# Altium PCB BOARD_4LAYER.PcbDoc (part 4 of 21)
Units mil, origin at the board's own origin, x right, y up, seen from the top; angles counter-clockwise.
Board outline 6692.91 x 10039.37 mil, 4 copper layers (Top Layer, Mid Layer 1, Mid Layer 2, Bottom Layer), stack 66.299 mil thick; 1532 components, 908 nets, 4105 pads, 1286 vias.
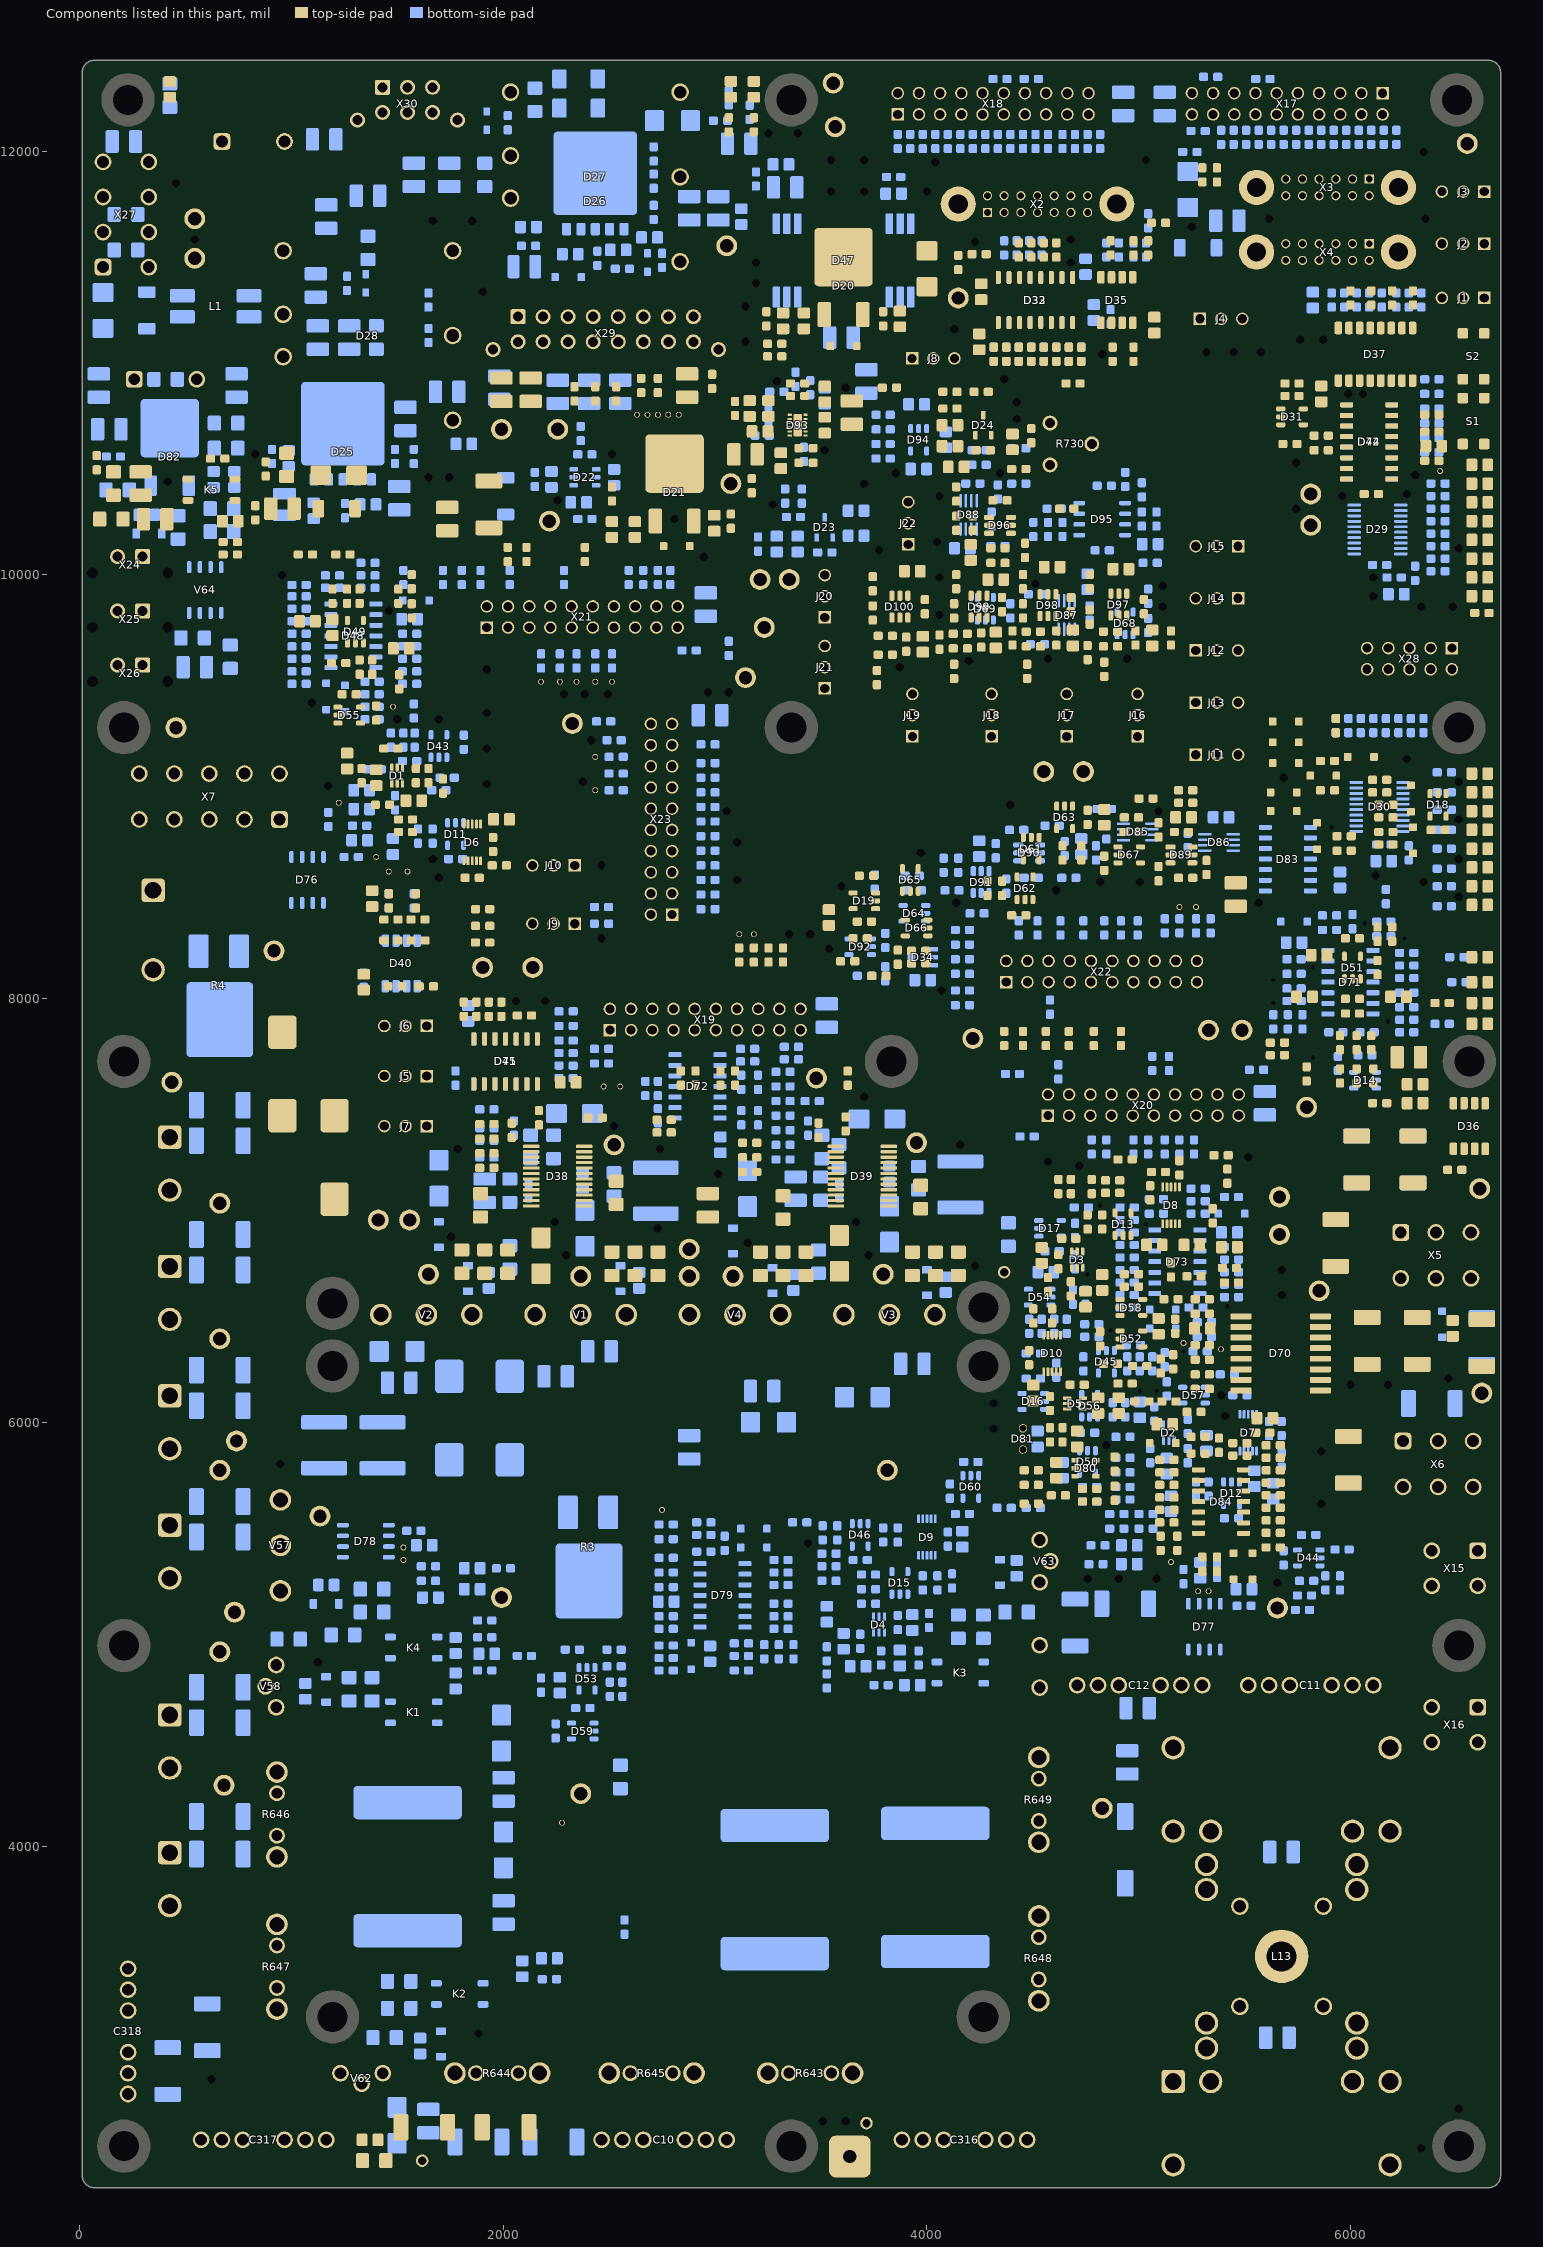
[diagram p6: the components of this part, seen from the top]

## Design rules (kind name [scope] priority, off if disabled: settings) (continued)
PolygonConnect PolygonConnect_In_UL_L-01_P380 [IsNamedPolygon('UL_L-01_P380')] p291: thpad.connectstyle=Relief thpad.reliefconductorwidth=19.68 thpad.reliefentries=4 thpad.polygonreliefangle="90 Angle" thpad.airgapwidth=9.84 smdpad.connectstyle=Relief smdpad.reliefconductorwidth=19.68 smdpad.reliefentries=4 smdpad.polygonreliefangle="90 Angle" smdpad.airgapwidth=9.84 via.connectstyle=Direct via.reliefconductorwidth=5.12 via.reliefentries=2 via.polygonreliefangle="90 Angle" via.airgapwidth=0
PolygonConnect PolygonConnect_In_$6N94_L01_P037 [IsNamedPolygon('$6N94_L01_P037')] p292: thpad.connectstyle=Relief thpad.reliefconductorwidth=19.68 thpad.reliefentries=4 thpad.polygonreliefangle="90 Angle" thpad.airgapwidth=9.84 smdpad.connectstyle=Relief smdpad.reliefconductorwidth=19.68 smdpad.reliefentries=4 smdpad.polygonreliefangle="90 Angle" smdpad.airgapwidth=9.84 via.connectstyle=Direct via.reliefconductorwidth=5.12 via.reliefentries=2 via.polygonreliefangle="90 Angle" via.airgapwidth=0
PolygonConnect PolygonConnect_In_$4N2807_L-01_P580 [IsNamedPolygon('$4N2807_L-01_P580')] p293: thpad.connectstyle=Relief thpad.reliefconductorwidth=19.68 thpad.reliefentries=4 thpad.polygonreliefangle="90 Angle" thpad.airgapwidth=9.84 smdpad.connectstyle=Relief smdpad.reliefconductorwidth=19.68 smdpad.reliefentries=4 smdpad.polygonreliefangle="90 Angle" smdpad.airgapwidth=9.84 via.connectstyle=Direct via.reliefconductorwidth=5.12 via.reliefentries=2 via.polygonreliefangle="90 Angle" via.airgapwidth=0
PolygonConnect PolygonConnect_In_GND_L02_P393 [IsNamedPolygon('GND_L02_P393')] p294: thpad.connectstyle=Relief thpad.reliefconductorwidth=19.68 thpad.reliefentries=4 thpad.polygonreliefangle="90 Angle" thpad.airgapwidth=9.84 smdpad.connectstyle=Relief smdpad.reliefconductorwidth=19.68 smdpad.reliefentries=4 smdpad.polygonreliefangle="90 Angle" smdpad.airgapwidth=9.84 via.connectstyle=Direct via.reliefconductorwidth=5.12 via.reliefentries=2 via.polygonreliefangle="90 Angle" via.airgapwidth=0
PolygonConnect PolygonConnect_In_$4N2819_L-01_P590 [IsNamedPolygon('$4N2819_L-01_P590')] p295: thpad.connectstyle=Relief thpad.reliefconductorwidth=19.68 thpad.reliefentries=4 thpad.polygonreliefangle="90 Angle" thpad.airgapwidth=9.84 smdpad.connectstyle=Relief smdpad.reliefconductorwidth=19.68 smdpad.reliefentries=4 smdpad.polygonreliefangle="90 Angle" smdpad.airgapwidth=9.84 via.connectstyle=Direct via.reliefconductorwidth=5.12 via.reliefentries=2 via.polygonreliefangle="90 Angle" via.airgapwidth=0
PolygonConnect PolygonConnect_In_$4N2806_L-01_P572 [IsNamedPolygon('$4N2806_L-01_P572')] p296: thpad.connectstyle=Relief thpad.reliefconductorwidth=19.68 thpad.reliefentries=4 thpad.polygonreliefangle="90 Angle" thpad.airgapwidth=9.84 smdpad.connectstyle=Relief smdpad.reliefconductorwidth=19.68 smdpad.reliefentries=4 smdpad.polygonreliefangle="90 Angle" smdpad.airgapwidth=9.84 via.connectstyle=Direct via.reliefconductorwidth=5.12 via.reliefentries=2 via.polygonreliefangle="90 Angle" via.airgapwidth=0
PolygonConnect PolygonConnect_In_PGND_L-01_P209 [IsNamedPolygon('PGND_L-01_P209')] p297: thpad.connectstyle=Relief thpad.reliefconductorwidth=19.68 thpad.reliefentries=4 thpad.polygonreliefangle="90 Angle" thpad.airgapwidth=9.84 smdpad.connectstyle=Relief smdpad.reliefconductorwidth=19.68 smdpad.reliefentries=4 smdpad.polygonreliefangle="90 Angle" smdpad.airgapwidth=9.84 via.connectstyle=Direct via.reliefconductorwidth=5.12 via.reliefentries=2 via.polygonreliefangle="90 Angle" via.airgapwidth=0
PolygonConnect PolygonConnect_In_+U_AMP_L01_P045 [IsNamedPolygon('+U_AMP_L01_P045')] p298: thpad.connectstyle=Relief thpad.reliefconductorwidth=19.68 thpad.reliefentries=4 thpad.polygonreliefangle="90 Angle" thpad.airgapwidth=9.84 smdpad.connectstyle=Relief smdpad.reliefconductorwidth=19.68 smdpad.reliefentries=4 smdpad.polygonreliefangle="90 Angle" smdpad.airgapwidth=9.84 via.connectstyle=Direct via.reliefconductorwidth=5.12 via.reliefentries=2 via.polygonreliefangle="90 Angle" via.airgapwidth=0
PolygonConnect PolygonConnect_In_$4N4008_L01_P551 [IsNamedPolygon('$4N4008_L01_P551')] p299: thpad.connectstyle=Relief thpad.reliefconductorwidth=19.68 thpad.reliefentries=4 thpad.polygonreliefangle="90 Angle" thpad.airgapwidth=9.84 smdpad.connectstyle=Relief smdpad.reliefconductorwidth=19.68 smdpad.reliefentries=4 smdpad.polygonreliefangle="90 Angle" smdpad.airgapwidth=9.84 via.connectstyle=Direct via.reliefconductorwidth=5.12 via.reliefentries=2 via.polygonreliefangle="90 Angle" via.airgapwidth=0
PolygonConnect PolygonConnect_In_GND_L-01_P390 [IsNamedPolygon('GND_L-01_P390')] p300: thpad.connectstyle=Relief thpad.reliefconductorwidth=19.68 thpad.reliefentries=4 thpad.polygonreliefangle="90 Angle" thpad.airgapwidth=9.84 smdpad.connectstyle=Relief smdpad.reliefconductorwidth=19.68 smdpad.reliefentries=4 smdpad.polygonreliefangle="90 Angle" smdpad.airgapwidth=9.84 via.connectstyle=Direct via.reliefconductorwidth=5.12 via.reliefentries=2 via.polygonreliefangle="90 Angle" via.airgapwidth=0
PolygonConnect PolygonConnect_In_$6N3156_L02_P078 [IsNamedPolygon('$6N3156_L02_P078')] p301: thpad.connectstyle=Relief thpad.reliefconductorwidth=19.68 thpad.reliefentries=4 thpad.polygonreliefangle="90 Angle" thpad.airgapwidth=9.84 smdpad.connectstyle=Relief smdpad.reliefconductorwidth=19.68 smdpad.reliefentries=4 smdpad.polygonreliefangle="90 Angle" smdpad.airgapwidth=9.84 via.connectstyle=Direct via.reliefconductorwidth=5.12 via.reliefentries=2 via.polygonreliefangle="90 Angle" via.airgapwidth=0
PolygonConnect PolygonConnect_In_-U_VENT_L01_P534 [IsNamedPolygon('-U_VENT_L01_P534')] p302: thpad.connectstyle=Relief thpad.reliefconductorwidth=19.68 thpad.reliefentries=4 thpad.polygonreliefangle="90 Angle" thpad.airgapwidth=9.84 smdpad.connectstyle=Relief smdpad.reliefconductorwidth=19.68 smdpad.reliefentries=4 smdpad.polygonreliefangle="90 Angle" smdpad.airgapwidth=9.84 via.connectstyle=Direct via.reliefconductorwidth=5.12 via.reliefentries=2 via.polygonreliefangle="90 Angle" via.airgapwidth=0
PolygonConnect PolygonConnect_In_~U_FIN_L-01_P131 [IsNamedPolygon('~U_FIN_L-01_P131')] p303: thpad.connectstyle=Relief thpad.reliefconductorwidth=19.68 thpad.reliefentries=4 thpad.polygonreliefangle="90 Angle" thpad.airgapwidth=9.84 smdpad.connectstyle=Relief smdpad.reliefconductorwidth=19.68 smdpad.reliefentries=4 smdpad.polygonreliefangle="90 Angle" smdpad.airgapwidth=9.84 via.connectstyle=Direct via.reliefconductorwidth=5.12 via.reliefentries=2 via.polygonreliefangle="90 Angle" via.airgapwidth=0
PolygonConnect PolygonConnect_In_+U_UM_L02_P488 [IsNamedPolygon('+U_UM_L02_P488')] p304: thpad.connectstyle=Relief thpad.reliefconductorwidth=19.68 thpad.reliefentries=4 thpad.polygonreliefangle="90 Angle" thpad.airgapwidth=9.84 smdpad.connectstyle=Relief smdpad.reliefconductorwidth=19.68 smdpad.reliefentries=4 smdpad.polygonreliefangle="90 Angle" smdpad.airgapwidth=9.84 via.connectstyle=Direct via.reliefconductorwidth=5.12 via.reliefentries=2 via.polygonreliefangle="90 Angle" via.airgapwidth=0
PolygonConnect PolygonConnect_In_PGND_L01_P299 [IsNamedPolygon('PGND_L01_P299')] p305: thpad.connectstyle=Relief thpad.reliefconductorwidth=19.68 thpad.reliefentries=4 thpad.polygonreliefangle="90 Angle" thpad.airgapwidth=9.84 smdpad.connectstyle=Relief smdpad.reliefconductorwidth=19.68 smdpad.reliefentries=4 smdpad.polygonreliefangle="90 Angle" smdpad.airgapwidth=9.84 via.connectstyle=Direct via.reliefconductorwidth=5.12 via.reliefentries=2 via.polygonreliefangle="90 Angle" via.airgapwidth=0
PolygonConnect PolygonConnect_In_PGND_L01_P273 [IsNamedPolygon('PGND_L01_P273')] p306: thpad.connectstyle=Relief thpad.reliefconductorwidth=19.68 thpad.reliefentries=4 thpad.polygonreliefangle="90 Angle" thpad.airgapwidth=9.84 smdpad.connectstyle=Relief smdpad.reliefconductorwidth=19.68 smdpad.reliefentries=4 smdpad.polygonreliefangle="90 Angle" smdpad.airgapwidth=9.84 via.connectstyle=Direct via.reliefconductorwidth=5.12 via.reliefentries=2 via.polygonreliefangle="90 Angle" via.airgapwidth=0
PolygonConnect PolygonConnect_In_$4N2819_L-01_P589 [IsNamedPolygon('$4N2819_L-01_P589')] p307: thpad.connectstyle=Relief thpad.reliefconductorwidth=19.68 thpad.reliefentries=4 thpad.polygonreliefangle="90 Angle" thpad.airgapwidth=9.84 smdpad.connectstyle=Relief smdpad.reliefconductorwidth=19.68 smdpad.reliefentries=4 smdpad.polygonreliefangle="90 Angle" smdpad.airgapwidth=9.84 via.connectstyle=Direct via.reliefconductorwidth=5.12 via.reliefentries=2 via.polygonreliefangle="90 Angle" via.airgapwidth=0
PolygonConnect PolygonConnect_In_$6N3156_L02_P066 [IsNamedPolygon('$6N3156_L02_P066')] p308: thpad.connectstyle=Relief thpad.reliefconductorwidth=19.68 thpad.reliefentries=4 thpad.polygonreliefangle="90 Angle" thpad.airgapwidth=9.84 smdpad.connectstyle=Relief smdpad.reliefconductorwidth=19.68 smdpad.reliefentries=4 smdpad.polygonreliefangle="90 Angle" smdpad.airgapwidth=9.84 via.connectstyle=Direct via.reliefconductorwidth=5.12 via.reliefentries=2 via.polygonreliefangle="90 Angle" via.airgapwidth=0
PolygonConnect PolygonConnect_In_-U_AMP_L01_P006 [IsNamedPolygon('-U_AMP_L01_P006')] p309: thpad.connectstyle=Relief thpad.reliefconductorwidth=19.68 thpad.reliefentries=4 thpad.polygonreliefangle="90 Angle" thpad.airgapwidth=9.84 smdpad.connectstyle=Relief smdpad.reliefconductorwidth=19.68 smdpad.reliefentries=4 smdpad.polygonreliefangle="90 Angle" smdpad.airgapwidth=9.84 via.connectstyle=Direct via.reliefconductorwidth=5.12 via.reliefentries=2 via.polygonreliefangle="90 Angle" via.airgapwidth=0
PolygonConnect PolygonConnect_In_PGND_L02_P290 [IsNamedPolygon('PGND_L02_P290')] p310: thpad.connectstyle=Relief thpad.reliefconductorwidth=19.68 thpad.reliefentries=4 thpad.polygonreliefangle="90 Angle" thpad.airgapwidth=9.84 smdpad.connectstyle=Relief smdpad.reliefconductorwidth=19.68 smdpad.reliefentries=4 smdpad.polygonreliefangle="90 Angle" smdpad.airgapwidth=9.84 via.connectstyle=Direct via.reliefconductorwidth=5.12 via.reliefentries=2 via.polygonreliefangle="90 Angle" via.airgapwidth=0
PolygonConnect PolygonConnect_In_$4N2807_L01_P577 [IsNamedPolygon('$4N2807_L01_P577')] p311: thpad.connectstyle=Relief thpad.reliefconductorwidth=19.68 thpad.reliefentries=4 thpad.polygonreliefangle="90 Angle" thpad.airgapwidth=9.84 smdpad.connectstyle=Relief smdpad.reliefconductorwidth=19.68 smdpad.reliefentries=4 smdpad.polygonreliefangle="90 Angle" smdpad.airgapwidth=9.84 via.connectstyle=Direct via.reliefconductorwidth=5.12 via.reliefentries=2 via.polygonreliefangle="90 Angle" via.airgapwidth=0
PolygonConnect PolygonConnect_In_$6N94_L02_P035 [IsNamedPolygon('$6N94_L02_P035')] p312: thpad.connectstyle=Relief thpad.reliefconductorwidth=19.68 thpad.reliefentries=4 thpad.polygonreliefangle="90 Angle" thpad.airgapwidth=9.84 smdpad.connectstyle=Relief smdpad.reliefconductorwidth=19.68 smdpad.reliefentries=4 smdpad.polygonreliefangle="90 Angle" smdpad.airgapwidth=9.84 via.connectstyle=Direct via.reliefconductorwidth=5.12 via.reliefentries=2 via.polygonreliefangle="90 Angle" via.airgapwidth=0
PolygonConnect PolygonConnect_In_PGND_L-01_P241 [IsNamedPolygon('PGND_L-01_P241')] p313: thpad.connectstyle=Relief thpad.reliefconductorwidth=19.68 thpad.reliefentries=4 thpad.polygonreliefangle="90 Angle" thpad.airgapwidth=9.84 smdpad.connectstyle=Relief smdpad.reliefconductorwidth=19.68 smdpad.reliefentries=4 smdpad.polygonreliefangle="90 Angle" smdpad.airgapwidth=9.84 via.connectstyle=Direct via.reliefconductorwidth=5.12 via.reliefentries=2 via.polygonreliefangle="90 Angle" via.airgapwidth=0
PolygonConnect PolygonConnect_In_$2N2408_L02_P167 [IsNamedPolygon('$2N2408_L02_P167')] p314: thpad.connectstyle=Relief thpad.reliefconductorwidth=19.68 thpad.reliefentries=4 thpad.polygonreliefangle="90 Angle" thpad.airgapwidth=9.84 smdpad.connectstyle=Relief smdpad.reliefconductorwidth=19.68 smdpad.reliefentries=4 smdpad.polygonreliefangle="90 Angle" smdpad.airgapwidth=9.84 via.connectstyle=Direct via.reliefconductorwidth=5.12 via.reliefentries=2 via.polygonreliefangle="90 Angle" via.airgapwidth=0
PolygonConnect PolygonConnect_In_PGND_L01_P269 [IsNamedPolygon('PGND_L01_P269')] p315: thpad.connectstyle=Relief thpad.reliefconductorwidth=19.68 thpad.reliefentries=4 thpad.polygonreliefangle="90 Angle" thpad.airgapwidth=9.84 smdpad.connectstyle=Relief smdpad.reliefconductorwidth=19.68 smdpad.reliefentries=4 smdpad.polygonreliefangle="90 Angle" smdpad.airgapwidth=9.84 via.connectstyle=Direct via.reliefconductorwidth=5.12 via.reliefentries=2 via.polygonreliefangle="90 Angle" via.airgapwidth=0
PolygonConnect PolygonConnect_In_GND_UM_L01_P621 [IsNamedPolygon('GND_UM_L01_P621')] p316: thpad.connectstyle=Relief thpad.reliefconductorwidth=19.68 thpad.reliefentries=4 thpad.polygonreliefangle="90 Angle" thpad.airgapwidth=9.84 smdpad.connectstyle=Relief smdpad.reliefconductorwidth=19.68 smdpad.reliefentries=4 smdpad.polygonreliefangle="90 Angle" smdpad.airgapwidth=9.84 via.connectstyle=Direct via.reliefconductorwidth=5.12 via.reliefentries=2 via.polygonreliefangle="90 Angle" via.airgapwidth=0
PolygonConnect PolygonConnect_In_$4N2819_L02_P588 [IsNamedPolygon('$4N2819_L02_P588')] p317: thpad.connectstyle=Relief thpad.reliefconductorwidth=19.68 thpad.reliefentries=4 thpad.polygonreliefangle="90 Angle" thpad.airgapwidth=9.84 smdpad.connectstyle=Relief smdpad.reliefconductorwidth=19.68 smdpad.reliefentries=4 smdpad.polygonreliefangle="90 Angle" smdpad.airgapwidth=9.84 via.connectstyle=Direct via.reliefconductorwidth=5.12 via.reliefentries=2 via.polygonreliefangle="90 Angle" via.airgapwidth=0
PolygonConnect PolygonConnect_In_GND_L02_P467 [IsNamedPolygon('GND_L02_P467')] p318: thpad.connectstyle=Relief thpad.reliefconductorwidth=19.68 thpad.reliefentries=4 thpad.polygonreliefangle="90 Angle" thpad.airgapwidth=9.84 smdpad.connectstyle=Relief smdpad.reliefconductorwidth=19.68 smdpad.reliefentries=4 smdpad.polygonreliefangle="90 Angle" smdpad.airgapwidth=9.84 via.connectstyle=Direct via.reliefconductorwidth=5.12 via.reliefentries=2 via.polygonreliefangle="90 Angle" via.airgapwidth=0
PolygonConnect PolygonConnect_In_GND_L01_P427 [IsNamedPolygon('GND_L01_P427')] p319: thpad.connectstyle=Relief thpad.reliefconductorwidth=19.68 thpad.reliefentries=4 thpad.polygonreliefangle="90 Angle" thpad.airgapwidth=9.84 smdpad.connectstyle=Relief smdpad.reliefconductorwidth=19.68 smdpad.reliefentries=4 smdpad.polygonreliefangle="90 Angle" smdpad.airgapwidth=9.84 via.connectstyle=Direct via.reliefconductorwidth=5.12 via.reliefentries=2 via.polygonreliefangle="90 Angle" via.airgapwidth=0
PolygonConnect PolygonConnect_In_GND_L01_P405 [IsNamedPolygon('GND_L01_P405')] p320: thpad.connectstyle=Relief thpad.reliefconductorwidth=19.68 thpad.reliefentries=4 thpad.polygonreliefangle="90 Angle" thpad.airgapwidth=9.84 smdpad.connectstyle=Relief smdpad.reliefconductorwidth=19.68 smdpad.reliefentries=4 smdpad.polygonreliefangle="90 Angle" smdpad.airgapwidth=9.84 via.connectstyle=Direct via.reliefconductorwidth=5.12 via.reliefentries=2 via.polygonreliefangle="90 Angle" via.airgapwidth=0
PolygonConnect PolygonConnect_In_GND_L01_P403 [IsNamedPolygon('GND_L01_P403')] p321: thpad.connectstyle=Relief thpad.reliefconductorwidth=19.68 thpad.reliefentries=4 thpad.polygonreliefangle="90 Angle" thpad.airgapwidth=9.84 smdpad.connectstyle=Relief smdpad.reliefconductorwidth=19.68 smdpad.reliefentries=4 smdpad.polygonreliefangle="90 Angle" smdpad.airgapwidth=9.84 via.connectstyle=Direct via.reliefconductorwidth=5.12 via.reliefentries=2 via.polygonreliefangle="90 Angle" via.airgapwidth=0
PolygonConnect PolygonConnect_In_U_FIN_L01_P144 [IsNamedPolygon('U_FIN_L01_P144')] p322: thpad.connectstyle=Relief thpad.reliefconductorwidth=19.68 thpad.reliefentries=4 thpad.polygonreliefangle="90 Angle" thpad.airgapwidth=9.84 smdpad.connectstyle=Relief smdpad.reliefconductorwidth=19.68 smdpad.reliefentries=4 smdpad.polygonreliefangle="90 Angle" smdpad.airgapwidth=9.84 via.connectstyle=Direct via.reliefconductorwidth=5.12 via.reliefentries=2 via.polygonreliefangle="90 Angle" via.airgapwidth=0
PolygonConnect PolygonConnect_In_$2N2430_L01_P348 [IsNamedPolygon('$2N2430_L01_P348')] p323: thpad.connectstyle=Relief thpad.reliefconductorwidth=19.68 thpad.reliefentries=4 thpad.polygonreliefangle="90 Angle" thpad.airgapwidth=9.84 smdpad.connectstyle=Relief smdpad.reliefconductorwidth=19.68 smdpad.reliefentries=4 smdpad.polygonreliefangle="90 Angle" smdpad.airgapwidth=9.84 via.connectstyle=Direct via.reliefconductorwidth=5.12 via.reliefentries=2 via.polygonreliefangle="90 Angle" via.airgapwidth=0
PolygonConnect PolygonConnect_In_GND_L01_P419 [IsNamedPolygon('GND_L01_P419')] p324: thpad.connectstyle=Relief thpad.reliefconductorwidth=19.68 thpad.reliefentries=4 thpad.polygonreliefangle="90 Angle" thpad.airgapwidth=9.84 smdpad.connectstyle=Relief smdpad.reliefconductorwidth=19.68 smdpad.reliefentries=4 smdpad.polygonreliefangle="90 Angle" smdpad.airgapwidth=9.84 via.connectstyle=Direct via.reliefconductorwidth=5.12 via.reliefentries=2 via.polygonreliefangle="90 Angle" via.airgapwidth=0
PolygonConnect PolygonConnect_In_GND_L01_P399 [IsNamedPolygon('GND_L01_P399')] p325: thpad.connectstyle=Relief thpad.reliefconductorwidth=19.68 thpad.reliefentries=4 thpad.polygonreliefangle="90 Angle" thpad.airgapwidth=9.84 smdpad.connectstyle=Relief smdpad.reliefconductorwidth=19.68 smdpad.reliefentries=4 smdpad.polygonreliefangle="90 Angle" smdpad.airgapwidth=9.84 via.connectstyle=Direct via.reliefconductorwidth=5.12 via.reliefentries=2 via.polygonreliefangle="90 Angle" via.airgapwidth=0
PolygonConnect PolygonConnect_In_I_MOST_L01_P333 [IsNamedPolygon('I_MOST_L01_P333')] p326: thpad.connectstyle=Relief thpad.reliefconductorwidth=19.68 thpad.reliefentries=4 thpad.polygonreliefangle="90 Angle" thpad.airgapwidth=9.84 smdpad.connectstyle=Relief smdpad.reliefconductorwidth=19.68 smdpad.reliefentries=4 smdpad.polygonreliefangle="90 Angle" smdpad.airgapwidth=9.84 via.connectstyle=Direct via.reliefconductorwidth=5.12 via.reliefentries=2 via.polygonreliefangle="90 Angle" via.airgapwidth=0
PolygonConnect PolygonConnect_In_$6N134_L01_P116 [IsNamedPolygon('$6N134_L01_P116')] p327: thpad.connectstyle=Relief thpad.reliefconductorwidth=19.68 thpad.reliefentries=4 thpad.polygonreliefangle="90 Angle" thpad.airgapwidth=9.84 smdpad.connectstyle=Relief smdpad.reliefconductorwidth=19.68 smdpad.reliefentries=4 smdpad.polygonreliefangle="90 Angle" smdpad.airgapwidth=9.84 via.connectstyle=Direct via.reliefconductorwidth=5.12 via.reliefentries=2 via.polygonreliefangle="90 Angle" via.airgapwidth=0
PolygonConnect PolygonConnect_In_GND_UM_L02_P617 [IsNamedPolygon('GND_UM_L02_P617')] p328: thpad.connectstyle=Relief thpad.reliefconductorwidth=19.68 thpad.reliefentries=4 thpad.polygonreliefangle="90 Angle" thpad.airgapwidth=9.84 smdpad.connectstyle=Relief smdpad.reliefconductorwidth=19.68 smdpad.reliefentries=4 smdpad.polygonreliefangle="90 Angle" smdpad.airgapwidth=9.84 via.connectstyle=Direct via.reliefconductorwidth=5.12 via.reliefentries=2 via.polygonreliefangle="90 Angle" via.airgapwidth=0
PolygonConnect PolygonConnect_In_GND_UM_L02_P608 [IsNamedPolygon('GND_UM_L02_P608')] p329: thpad.connectstyle=Relief thpad.reliefconductorwidth=19.68 thpad.reliefentries=4 thpad.polygonreliefangle="90 Angle" thpad.airgapwidth=9.84 smdpad.connectstyle=Relief smdpad.reliefconductorwidth=19.68 smdpad.reliefentries=4 smdpad.polygonreliefangle="90 Angle" smdpad.airgapwidth=9.84 via.connectstyle=Direct via.reliefconductorwidth=5.12 via.reliefentries=2 via.polygonreliefangle="90 Angle" via.airgapwidth=0
PolygonConnect PolygonConnect_In_$4N4016_L02_P545 [IsNamedPolygon('$4N4016_L02_P545')] p330: thpad.connectstyle=Relief thpad.reliefconductorwidth=19.68 thpad.reliefentries=4 thpad.polygonreliefangle="90 Angle" thpad.airgapwidth=9.84 smdpad.connectstyle=Relief smdpad.reliefconductorwidth=19.68 smdpad.reliefentries=4 smdpad.polygonreliefangle="90 Angle" smdpad.airgapwidth=9.84 via.connectstyle=Direct via.reliefconductorwidth=5.12 via.reliefentries=2 via.polygonreliefangle="90 Angle" via.airgapwidth=0
PolygonConnect PolygonConnect_In_$6N135_L02_P091 [IsNamedPolygon('$6N135_L02_P091')] p331: thpad.connectstyle=Relief thpad.reliefconductorwidth=19.68 thpad.reliefentries=4 thpad.polygonreliefangle="90 Angle" thpad.airgapwidth=9.84 smdpad.connectstyle=Relief smdpad.reliefconductorwidth=19.68 smdpad.reliefentries=4 smdpad.polygonreliefangle="90 Angle" smdpad.airgapwidth=9.84 via.connectstyle=Direct via.reliefconductorwidth=5.12 via.reliefentries=2 via.polygonreliefangle="90 Angle" via.airgapwidth=0
PolygonConnect PolygonConnect_In_UH_L02_P320 [IsNamedPolygon('UH_L02_P320')] p332: thpad.connectstyle=Relief thpad.reliefconductorwidth=19.68 thpad.reliefentries=4 thpad.polygonreliefangle="90 Angle" thpad.airgapwidth=9.84 smdpad.connectstyle=Relief smdpad.reliefconductorwidth=19.68 smdpad.reliefentries=4 smdpad.polygonreliefangle="90 Angle" smdpad.airgapwidth=9.84 via.connectstyle=Direct via.reliefconductorwidth=5.12 via.reliefentries=2 via.polygonreliefangle="90 Angle" via.airgapwidth=0
PolygonConnect PolygonConnect_In_$6N106_L-01_P054 [IsNamedPolygon('$6N106_L-01_P054')] p333: thpad.connectstyle=Relief thpad.reliefconductorwidth=19.68 thpad.reliefentries=4 thpad.polygonreliefangle="90 Angle" thpad.airgapwidth=9.84 smdpad.connectstyle=Relief smdpad.reliefconductorwidth=19.68 smdpad.reliefentries=4 smdpad.polygonreliefangle="90 Angle" smdpad.airgapwidth=9.84 via.connectstyle=Direct via.reliefconductorwidth=5.12 via.reliefentries=2 via.polygonreliefangle="90 Angle" via.airgapwidth=0
PolygonConnect PolygonConnect_In_-U_VENT_L-01_P523 [IsNamedPolygon('-U_VENT_L-01_P523')] p334: thpad.connectstyle=Relief thpad.reliefconductorwidth=19.68 thpad.reliefentries=4 thpad.polygonreliefangle="90 Angle" thpad.airgapwidth=9.84 smdpad.connectstyle=Relief smdpad.reliefconductorwidth=19.68 smdpad.reliefentries=4 smdpad.polygonreliefangle="90 Angle" smdpad.airgapwidth=9.84 via.connectstyle=Direct via.reliefconductorwidth=5.12 via.reliefentries=2 via.polygonreliefangle="90 Angle" via.airgapwidth=0
PolygonConnect PolygonConnect_In_$6N737_L01_P013 [IsNamedPolygon('$6N737_L01_P013')] p335: thpad.connectstyle=Relief thpad.reliefconductorwidth=19.68 thpad.reliefentries=4 thpad.polygonreliefangle="90 Angle" thpad.airgapwidth=9.84 smdpad.connectstyle=Relief smdpad.reliefconductorwidth=19.68 smdpad.reliefentries=4 smdpad.polygonreliefangle="90 Angle" smdpad.airgapwidth=9.84 via.connectstyle=Direct via.reliefconductorwidth=5.12 via.reliefentries=2 via.polygonreliefangle="90 Angle" via.airgapwidth=0
PolygonConnect PolygonConnect_In_+U_POWER_L-01_P128 [IsNamedPolygon('+U_POWER_L-01_P128')] p336: thpad.connectstyle=Relief thpad.reliefconductorwidth=19.68 thpad.reliefentries=4 thpad.polygonreliefangle="90 Angle" thpad.airgapwidth=9.84 smdpad.connectstyle=Relief smdpad.reliefconductorwidth=19.68 smdpad.reliefentries=4 smdpad.polygonreliefangle="90 Angle" smdpad.airgapwidth=9.84 via.connectstyle=Direct via.reliefconductorwidth=5.12 via.reliefentries=2 via.polygonreliefangle="90 Angle" via.airgapwidth=0
PolygonConnect PolygonConnect_In_PGND_L-01_P201 [IsNamedPolygon('PGND_L-01_P201')] p337: thpad.connectstyle=Relief thpad.reliefconductorwidth=19.68 thpad.reliefentries=4 thpad.polygonreliefangle="90 Angle" thpad.airgapwidth=9.84 smdpad.connectstyle=Relief smdpad.reliefconductorwidth=19.68 smdpad.reliefentries=4 smdpad.polygonreliefangle="90 Angle" smdpad.airgapwidth=9.84 via.connectstyle=Direct via.reliefconductorwidth=5.12 via.reliefentries=2 via.polygonreliefangle="90 Angle" via.airgapwidth=0
PolygonConnect PolygonConnect_In_U_FIN_L01_P145 [IsNamedPolygon('U_FIN_L01_P145')] p338: thpad.connectstyle=Relief thpad.reliefconductorwidth=19.68 thpad.reliefentries=4 thpad.polygonreliefangle="90 Angle" thpad.airgapwidth=9.84 smdpad.connectstyle=Relief smdpad.reliefconductorwidth=19.68 smdpad.reliefentries=4 smdpad.polygonreliefangle="90 Angle" smdpad.airgapwidth=9.84 via.connectstyle=Direct via.reliefconductorwidth=5.12 via.reliefentries=2 via.polygonreliefangle="90 Angle" via.airgapwidth=0
PolygonConnect PolygonConnect_In_PGND_L-01_P306 [IsNamedPolygon('PGND_L-01_P306')] p339: thpad.connectstyle=Relief thpad.reliefconductorwidth=19.68 thpad.reliefentries=4 thpad.polygonreliefangle="90 Angle" thpad.airgapwidth=9.84 smdpad.connectstyle=Relief smdpad.reliefconductorwidth=19.68 smdpad.reliefentries=4 smdpad.polygonreliefangle="90 Angle" smdpad.airgapwidth=9.84 via.connectstyle=Direct via.reliefconductorwidth=5.12 via.reliefentries=2 via.polygonreliefangle="90 Angle" via.airgapwidth=0
PolygonConnect PolygonConnect_In_GND_UM_L01_P628 [IsNamedPolygon('GND_UM_L01_P628')] p340: thpad.connectstyle=Relief thpad.reliefconductorwidth=19.68 thpad.reliefentries=4 thpad.polygonreliefangle="90 Angle" thpad.airgapwidth=9.84 smdpad.connectstyle=Relief smdpad.reliefconductorwidth=19.68 smdpad.reliefentries=4 smdpad.polygonreliefangle="90 Angle" smdpad.airgapwidth=9.84 via.connectstyle=Direct via.reliefconductorwidth=5.12 via.reliefentries=2 via.polygonreliefangle="90 Angle" via.airgapwidth=0
PolygonConnect PolygonConnect_In_PGND_L01_P256 [IsNamedPolygon('PGND_L01_P256')] p341: thpad.connectstyle=Relief thpad.reliefconductorwidth=19.68 thpad.reliefentries=4 thpad.polygonreliefangle="90 Angle" thpad.airgapwidth=9.84 smdpad.connectstyle=Relief smdpad.reliefconductorwidth=19.68 smdpad.reliefentries=4 smdpad.polygonreliefangle="90 Angle" smdpad.airgapwidth=9.84 via.connectstyle=Direct via.reliefconductorwidth=5.12 via.reliefentries=2 via.polygonreliefangle="90 Angle" via.airgapwidth=0
PolygonConnect PolygonConnect_In_GND_L01_P418 [IsNamedPolygon('GND_L01_P418')] p342: thpad.connectstyle=Relief thpad.reliefconductorwidth=19.68 thpad.reliefentries=4 thpad.polygonreliefangle="90 Angle" thpad.airgapwidth=9.84 smdpad.connectstyle=Relief smdpad.reliefconductorwidth=19.68 smdpad.reliefentries=4 smdpad.polygonreliefangle="90 Angle" smdpad.airgapwidth=9.84 via.connectstyle=Direct via.reliefconductorwidth=5.12 via.reliefentries=2 via.polygonreliefangle="90 Angle" via.airgapwidth=0
PolygonConnect PolygonConnect_In_PGND_L01_P276 [IsNamedPolygon('PGND_L01_P276')] p343: thpad.connectstyle=Relief thpad.reliefconductorwidth=19.68 thpad.reliefentries=4 thpad.polygonreliefangle="90 Angle" thpad.airgapwidth=9.84 smdpad.connectstyle=Relief smdpad.reliefconductorwidth=19.68 smdpad.reliefentries=4 smdpad.polygonreliefangle="90 Angle" smdpad.airgapwidth=9.84 via.connectstyle=Direct via.reliefconductorwidth=5.12 via.reliefentries=2 via.polygonreliefangle="90 Angle" via.airgapwidth=0
PolygonConnect PolygonConnect_In_$2N2408_L01_P171 [IsNamedPolygon('$2N2408_L01_P171')] p344: thpad.connectstyle=Relief thpad.reliefconductorwidth=19.68 thpad.reliefentries=4 thpad.polygonreliefangle="90 Angle" thpad.airgapwidth=9.84 smdpad.connectstyle=Relief smdpad.reliefconductorwidth=19.68 smdpad.reliefentries=4 smdpad.polygonreliefangle="90 Angle" smdpad.airgapwidth=9.84 via.connectstyle=Direct via.reliefconductorwidth=5.12 via.reliefentries=2 via.polygonreliefangle="90 Angle" via.airgapwidth=0
PolygonConnect PolygonConnect_In_U_FIN_L-01_P139 [IsNamedPolygon('U_FIN_L-01_P139')] p345: thpad.connectstyle=Relief thpad.reliefconductorwidth=19.68 thpad.reliefentries=4 thpad.polygonreliefangle="90 Angle" thpad.airgapwidth=9.84 smdpad.connectstyle=Relief smdpad.reliefconductorwidth=19.68 smdpad.reliefentries=4 smdpad.polygonreliefangle="90 Angle" smdpad.airgapwidth=9.84 via.connectstyle=Direct via.reliefconductorwidth=5.12 via.reliefentries=2 via.polygonreliefangle="90 Angle" via.airgapwidth=0
PolygonConnect PolygonConnect_In_$6N94_L01_P028 [IsNamedPolygon('$6N94_L01_P028')] p346: thpad.connectstyle=Relief thpad.reliefconductorwidth=19.68 thpad.reliefentries=4 thpad.polygonreliefangle="90 Angle" thpad.airgapwidth=9.84 smdpad.connectstyle=Relief smdpad.reliefconductorwidth=19.68 smdpad.reliefentries=4 smdpad.polygonreliefangle="90 Angle" smdpad.airgapwidth=9.84 via.connectstyle=Direct via.reliefconductorwidth=5.12 via.reliefentries=2 via.polygonreliefangle="90 Angle" via.airgapwidth=0
PolygonConnect PolygonConnect_In_PGND_L02_P246 [IsNamedPolygon('PGND_L02_P246')] p347: thpad.connectstyle=Relief thpad.reliefconductorwidth=19.68 thpad.reliefentries=4 thpad.polygonreliefangle="90 Angle" thpad.airgapwidth=9.84 smdpad.connectstyle=Relief smdpad.reliefconductorwidth=19.68 smdpad.reliefentries=4 smdpad.polygonreliefangle="90 Angle" smdpad.airgapwidth=9.84 via.connectstyle=Direct via.reliefconductorwidth=5.12 via.reliefentries=2 via.polygonreliefangle="90 Angle" via.airgapwidth=0
PolygonConnect PolygonConnect_In_PGND_L-01_P313 [IsNamedPolygon('PGND_L-01_P313')] p348: thpad.connectstyle=Relief thpad.reliefconductorwidth=19.68 thpad.reliefentries=4 thpad.polygonreliefangle="90 Angle" thpad.airgapwidth=9.84 smdpad.connectstyle=Relief smdpad.reliefconductorwidth=19.68 smdpad.reliefentries=4 smdpad.polygonreliefangle="90 Angle" smdpad.airgapwidth=9.84 via.connectstyle=Direct via.reliefconductorwidth=5.12 via.reliefentries=2 via.polygonreliefangle="90 Angle" via.airgapwidth=0
PolygonConnect PolygonConnect_In_$4N2807_L-01_P581 [IsNamedPolygon('$4N2807_L-01_P581')] p349: thpad.connectstyle=Relief thpad.reliefconductorwidth=19.68 thpad.reliefentries=4 thpad.polygonreliefangle="90 Angle" thpad.airgapwidth=9.84 smdpad.connectstyle=Relief smdpad.reliefconductorwidth=19.68 smdpad.reliefentries=4 smdpad.polygonreliefangle="90 Angle" smdpad.airgapwidth=9.84 via.connectstyle=Direct via.reliefconductorwidth=5.12 via.reliefentries=2 via.polygonreliefangle="90 Angle" via.airgapwidth=0
PolygonConnect PolygonConnect_In_$4N4014_L-01_P567 [IsNamedPolygon('$4N4014_L-01_P567')] p350: thpad.connectstyle=Relief thpad.reliefconductorwidth=19.68 thpad.reliefentries=4 thpad.polygonreliefangle="90 Angle" thpad.airgapwidth=9.84 smdpad.connectstyle=Relief smdpad.reliefconductorwidth=19.68 smdpad.reliefentries=4 smdpad.polygonreliefangle="90 Angle" smdpad.airgapwidth=9.84 via.connectstyle=Direct via.reliefconductorwidth=5.12 via.reliefentries=2 via.polygonreliefangle="90 Angle" via.airgapwidth=0
PolygonConnect PolygonConnect_In_U_FIN_L-01_P141 [IsNamedPolygon('U_FIN_L-01_P141')] p351: thpad.connectstyle=Relief thpad.reliefconductorwidth=19.68 thpad.reliefentries=4 thpad.polygonreliefangle="90 Angle" thpad.airgapwidth=9.84 smdpad.connectstyle=Relief smdpad.reliefconductorwidth=19.68 smdpad.reliefentries=4 smdpad.polygonreliefangle="90 Angle" smdpad.airgapwidth=9.84 via.connectstyle=Direct via.reliefconductorwidth=5.12 via.reliefentries=2 via.polygonreliefangle="90 Angle" via.airgapwidth=0
PolygonConnect PolygonConnect_In_~U_FIN_L01_P132 [IsNamedPolygon('~U_FIN_L01_P132')] p352: thpad.connectstyle=Relief thpad.reliefconductorwidth=19.68 thpad.reliefentries=4 thpad.polygonreliefangle="90 Angle" thpad.airgapwidth=9.84 smdpad.connectstyle=Relief smdpad.reliefconductorwidth=19.68 smdpad.reliefentries=4 smdpad.polygonreliefangle="90 Angle" smdpad.airgapwidth=9.84 via.connectstyle=Direct via.reliefconductorwidth=5.12 via.reliefentries=2 via.polygonreliefangle="90 Angle" via.airgapwidth=0
PolygonConnect PolygonConnect_In_+U_VENT_L02_P501 [IsNamedPolygon('+U_VENT_L02_P501')] p353: thpad.connectstyle=Relief thpad.reliefconductorwidth=19.68 thpad.reliefentries=4 thpad.polygonreliefangle="90 Angle" thpad.airgapwidth=9.84 smdpad.connectstyle=Relief smdpad.reliefconductorwidth=19.68 smdpad.reliefentries=4 smdpad.polygonreliefangle="90 Angle" smdpad.airgapwidth=9.84 via.connectstyle=Direct via.reliefconductorwidth=5.12 via.reliefentries=2 via.polygonreliefangle="90 Angle" via.airgapwidth=0
PolygonConnect PolygonConnect_In_PGND_L-01_P275 [IsNamedPolygon('PGND_L-01_P275')] p354: thpad.connectstyle=Relief thpad.reliefconductorwidth=19.68 thpad.reliefentries=4 thpad.polygonreliefangle="90 Angle" thpad.airgapwidth=9.84 smdpad.connectstyle=Relief smdpad.reliefconductorwidth=19.68 smdpad.reliefentries=4 smdpad.polygonreliefangle="90 Angle" smdpad.airgapwidth=9.84 via.connectstyle=Direct via.reliefconductorwidth=5.12 via.reliefentries=2 via.polygonreliefangle="90 Angle" via.airgapwidth=0
PolygonConnect PolygonConnect_In_PGND_L01_P264 [IsNamedPolygon('PGND_L01_P264')] p355: thpad.connectstyle=Relief thpad.reliefconductorwidth=19.68 thpad.reliefentries=4 thpad.polygonreliefangle="90 Angle" thpad.airgapwidth=9.84 smdpad.connectstyle=Relief smdpad.reliefconductorwidth=19.68 smdpad.reliefentries=4 smdpad.polygonreliefangle="90 Angle" smdpad.airgapwidth=9.84 via.connectstyle=Direct via.reliefconductorwidth=5.12 via.reliefentries=2 via.polygonreliefangle="90 Angle" via.airgapwidth=0
PolygonConnect PolygonConnect_In_PGND_L-01_P253 [IsNamedPolygon('PGND_L-01_P253')] p356: thpad.connectstyle=Relief thpad.reliefconductorwidth=19.68 thpad.reliefentries=4 thpad.polygonreliefangle="90 Angle" thpad.airgapwidth=9.84 smdpad.connectstyle=Relief smdpad.reliefconductorwidth=19.68 smdpad.reliefentries=4 smdpad.polygonreliefangle="90 Angle" smdpad.airgapwidth=9.84 via.connectstyle=Direct via.reliefconductorwidth=5.12 via.reliefentries=2 via.polygonreliefangle="90 Angle" via.airgapwidth=0
PolygonConnect PolygonConnect_In_$6N737_L-01_P015 [IsNamedPolygon('$6N737_L-01_P015')] p357: thpad.connectstyle=Relief thpad.reliefconductorwidth=19.68 thpad.reliefentries=4 thpad.polygonreliefangle="90 Angle" thpad.airgapwidth=9.84 smdpad.connectstyle=Relief smdpad.reliefconductorwidth=19.68 smdpad.reliefentries=4 smdpad.polygonreliefangle="90 Angle" smdpad.airgapwidth=9.84 via.connectstyle=Direct via.reliefconductorwidth=5.12 via.reliefentries=2 via.polygonreliefangle="90 Angle" via.airgapwidth=0
PolygonConnect PolygonConnect_In_U_TP_L-01_P352 [IsNamedPolygon('U_TP_L-01_P352')] p358: thpad.connectstyle=Relief thpad.reliefconductorwidth=19.68 thpad.reliefentries=4 thpad.polygonreliefangle="90 Angle" thpad.airgapwidth=9.84 smdpad.connectstyle=Relief smdpad.reliefconductorwidth=19.68 smdpad.reliefentries=4 smdpad.polygonreliefangle="90 Angle" smdpad.airgapwidth=9.84 via.connectstyle=Direct via.reliefconductorwidth=5.12 via.reliefentries=2 via.polygonreliefangle="90 Angle" via.airgapwidth=0
PolygonConnect PolygonConnect_In_GND_L01_P401 [IsNamedPolygon('GND_L01_P401')] p359: thpad.connectstyle=Relief thpad.reliefconductorwidth=19.68 thpad.reliefentries=4 thpad.polygonreliefangle="90 Angle" thpad.airgapwidth=9.84 smdpad.connectstyle=Relief smdpad.reliefconductorwidth=19.68 smdpad.reliefentries=4 smdpad.polygonreliefangle="90 Angle" smdpad.airgapwidth=9.84 via.connectstyle=Direct via.reliefconductorwidth=5.12 via.reliefentries=2 via.polygonreliefangle="90 Angle" via.airgapwidth=0
PolygonConnect PolygonConnect_In_GND_UM_L02_P611 [IsNamedPolygon('GND_UM_L02_P611')] p360: thpad.connectstyle=Relief thpad.reliefconductorwidth=19.68 thpad.reliefentries=4 thpad.polygonreliefangle="90 Angle" thpad.airgapwidth=9.84 smdpad.connectstyle=Relief smdpad.reliefconductorwidth=19.68 smdpad.reliefentries=4 smdpad.polygonreliefangle="90 Angle" smdpad.airgapwidth=9.84 via.connectstyle=Direct via.reliefconductorwidth=5.12 via.reliefentries=2 via.polygonreliefangle="90 Angle" via.airgapwidth=0
PolygonConnect PolygonConnect_In_PGND_L02_P207 [IsNamedPolygon('PGND_L02_P207')] p361: thpad.connectstyle=Relief thpad.reliefconductorwidth=19.68 thpad.reliefentries=4 thpad.polygonreliefangle="90 Angle" thpad.airgapwidth=9.84 smdpad.connectstyle=Relief smdpad.reliefconductorwidth=19.68 smdpad.reliefentries=4 smdpad.polygonreliefangle="90 Angle" smdpad.airgapwidth=9.84 via.connectstyle=Direct via.reliefconductorwidth=5.12 via.reliefentries=2 via.polygonreliefangle="90 Angle" via.airgapwidth=0
PolygonConnect PolygonConnect_In_U_TS_L02_P156 [IsNamedPolygon('U_TS_L02_P156')] p362: thpad.connectstyle=Relief thpad.reliefconductorwidth=19.68 thpad.reliefentries=4 thpad.polygonreliefangle="90 Angle" thpad.airgapwidth=9.84 smdpad.connectstyle=Relief smdpad.reliefconductorwidth=19.68 smdpad.reliefentries=4 smdpad.polygonreliefangle="90 Angle" smdpad.airgapwidth=9.84 via.connectstyle=Direct via.reliefconductorwidth=5.12 via.reliefentries=2 via.polygonreliefangle="90 Angle" via.airgapwidth=0
PolygonConnect PolygonConnect_In_PGND_L02_P185 [IsNamedPolygon('PGND_L02_P185')] p363: thpad.connectstyle=Relief thpad.reliefconductorwidth=19.68 thpad.reliefentries=4 thpad.polygonreliefangle="90 Angle" thpad.airgapwidth=9.84 smdpad.connectstyle=Relief smdpad.reliefconductorwidth=19.68 smdpad.reliefentries=4 smdpad.polygonreliefangle="90 Angle" smdpad.airgapwidth=9.84 via.connectstyle=Direct via.reliefconductorwidth=5.12 via.reliefentries=2 via.polygonreliefangle="90 Angle" via.airgapwidth=0
PolygonConnect PolygonConnect_In_$2N2408_L-01_P161 [IsNamedPolygon('$2N2408_L-01_P161')] p364: thpad.connectstyle=Relief thpad.reliefconductorwidth=19.68 thpad.reliefentries=4 thpad.polygonreliefangle="90 Angle" thpad.airgapwidth=9.84 smdpad.connectstyle=Relief smdpad.reliefconductorwidth=19.68 smdpad.reliefentries=4 smdpad.polygonreliefangle="90 Angle" smdpad.airgapwidth=9.84 via.connectstyle=Direct via.reliefconductorwidth=5.12 via.reliefentries=2 via.polygonreliefangle="90 Angle" via.airgapwidth=0
PolygonConnect PolygonConnect_In_+U_POWER_L02_P119 [IsNamedPolygon('+U_POWER_L02_P119')] p365: thpad.connectstyle=Relief thpad.reliefconductorwidth=19.68 thpad.reliefentries=4 thpad.polygonreliefangle="90 Angle" thpad.airgapwidth=9.84 smdpad.connectstyle=Relief smdpad.reliefconductorwidth=19.68 smdpad.reliefentries=4 smdpad.polygonreliefangle="90 Angle" smdpad.airgapwidth=9.84 via.connectstyle=Direct via.reliefconductorwidth=5.12 via.reliefentries=2 via.polygonreliefangle="90 Angle" via.airgapwidth=0
PolygonConnect PolygonConnect_In_I_MOST_L-01_P331 [IsNamedPolygon('I_MOST_L-01_P331')] p366: thpad.connectstyle=Relief thpad.reliefconductorwidth=19.68 thpad.reliefentries=4 thpad.polygonreliefangle="90 Angle" thpad.airgapwidth=9.84 smdpad.connectstyle=Relief smdpad.reliefconductorwidth=19.68 smdpad.reliefentries=4 smdpad.polygonreliefangle="90 Angle" smdpad.airgapwidth=9.84 via.connectstyle=Direct via.reliefconductorwidth=5.12 via.reliefentries=2 via.polygonreliefangle="90 Angle" via.airgapwidth=0
PolygonConnect PolygonConnect_In_PGND_L-01_P304 [IsNamedPolygon('PGND_L-01_P304')] p367: thpad.connectstyle=Relief thpad.reliefconductorwidth=19.68 thpad.reliefentries=4 thpad.polygonreliefangle="90 Angle" thpad.airgapwidth=9.84 smdpad.connectstyle=Relief smdpad.reliefconductorwidth=19.68 smdpad.reliefentries=4 smdpad.polygonreliefangle="90 Angle" smdpad.airgapwidth=9.84 via.connectstyle=Direct via.reliefconductorwidth=5.12 via.reliefentries=2 via.polygonreliefangle="90 Angle" via.airgapwidth=0
PolygonConnect PolygonConnect_In_UL_L02_P381 [IsNamedPolygon('UL_L02_P381')] p368: thpad.connectstyle=Relief thpad.reliefconductorwidth=19.68 thpad.reliefentries=4 thpad.polygonreliefangle="90 Angle" thpad.airgapwidth=9.84 smdpad.connectstyle=Relief smdpad.reliefconductorwidth=19.68 smdpad.reliefentries=4 smdpad.polygonreliefangle="90 Angle" smdpad.airgapwidth=9.84 via.connectstyle=Direct via.reliefconductorwidth=5.12 via.reliefentries=2 via.polygonreliefangle="90 Angle" via.airgapwidth=0
PolygonConnect PolygonConnect_In_PGND_L-01_P237 [IsNamedPolygon('PGND_L-01_P237')] p369: thpad.connectstyle=Relief thpad.reliefconductorwidth=19.68 thpad.reliefentries=4 thpad.polygonreliefangle="90 Angle" thpad.airgapwidth=9.84 smdpad.connectstyle=Relief smdpad.reliefconductorwidth=19.68 smdpad.reliefentries=4 smdpad.polygonreliefangle="90 Angle" smdpad.airgapwidth=9.84 via.connectstyle=Direct via.reliefconductorwidth=5.12 via.reliefentries=2 via.polygonreliefangle="90 Angle" via.airgapwidth=0
PolygonConnect PolygonConnect_In_$4N4005_L-01_P552 [IsNamedPolygon('$4N4005_L-01_P552')] p370: thpad.connectstyle=Relief thpad.reliefconductorwidth=19.68 thpad.reliefentries=4 thpad.polygonreliefangle="90 Angle" thpad.airgapwidth=9.84 smdpad.connectstyle=Relief smdpad.reliefconductorwidth=19.68 smdpad.reliefentries=4 smdpad.polygonreliefangle="90 Angle" smdpad.airgapwidth=9.84 via.connectstyle=Direct via.reliefconductorwidth=5.12 via.reliefentries=2 via.polygonreliefangle="90 Angle" via.airgapwidth=0
PolygonConnect PolygonConnect_In_GND_L01_P443 [IsNamedPolygon('GND_L01_P443')] p371: thpad.connectstyle=Relief thpad.reliefconductorwidth=19.68 thpad.reliefentries=4 thpad.polygonreliefangle="90 Angle" thpad.airgapwidth=9.84 smdpad.connectstyle=Relief smdpad.reliefconductorwidth=19.68 smdpad.reliefentries=4 smdpad.polygonreliefangle="90 Angle" smdpad.airgapwidth=9.84 via.connectstyle=Direct via.reliefconductorwidth=5.12 via.reliefentries=2 via.polygonreliefangle="90 Angle" via.airgapwidth=0
PolygonConnect PolygonConnect_In_-U_VENT_L-01_P532 [IsNamedPolygon('-U_VENT_L-01_P532')] p372: thpad.connectstyle=Relief thpad.reliefconductorwidth=19.68 thpad.reliefentries=4 thpad.polygonreliefangle="90 Angle" thpad.airgapwidth=9.84 smdpad.connectstyle=Relief smdpad.reliefconductorwidth=19.68 smdpad.reliefentries=4 smdpad.polygonreliefangle="90 Angle" smdpad.airgapwidth=9.84 via.connectstyle=Direct via.reliefconductorwidth=5.12 via.reliefentries=2 via.polygonreliefangle="90 Angle" via.airgapwidth=0
PolygonConnect PolygonConnect_In_$6N3156_L-01_P077 [IsNamedPolygon('$6N3156_L-01_P077')] p373: thpad.connectstyle=Relief thpad.reliefconductorwidth=19.68 thpad.reliefentries=4 thpad.polygonreliefangle="90 Angle" thpad.airgapwidth=9.84 smdpad.connectstyle=Relief smdpad.reliefconductorwidth=19.68 smdpad.reliefentries=4 smdpad.polygonreliefangle="90 Angle" smdpad.airgapwidth=9.84 via.connectstyle=Direct via.reliefconductorwidth=5.12 via.reliefentries=2 via.polygonreliefangle="90 Angle" via.airgapwidth=0
PolygonConnect PolygonConnect_In_PGND_L-01_P190 [IsNamedPolygon('PGND_L-01_P190')] p374: thpad.connectstyle=Relief thpad.reliefconductorwidth=19.68 thpad.reliefentries=4 thpad.polygonreliefangle="90 Angle" thpad.airgapwidth=9.84 smdpad.connectstyle=Relief smdpad.reliefconductorwidth=19.68 smdpad.reliefentries=4 smdpad.polygonreliefangle="90 Angle" smdpad.airgapwidth=9.84 via.connectstyle=Direct via.reliefconductorwidth=5.12 via.reliefentries=2 via.polygonreliefangle="90 Angle" via.airgapwidth=0
PolygonConnect PolygonConnect_In_UH_L-01_P316 [IsNamedPolygon('UH_L-01_P316')] p375: thpad.connectstyle=Relief thpad.reliefconductorwidth=19.68 thpad.reliefentries=4 thpad.polygonreliefangle="90 Angle" thpad.airgapwidth=9.84 smdpad.connectstyle=Relief smdpad.reliefconductorwidth=19.68 smdpad.reliefentries=4 smdpad.polygonreliefangle="90 Angle" smdpad.airgapwidth=9.84 via.connectstyle=Direct via.reliefconductorwidth=5.12 via.reliefentries=2 via.polygonreliefangle="90 Angle" via.airgapwidth=0
PolygonConnect PolygonConnect_In_UH_L01_P326 [IsNamedPolygon('UH_L01_P326')] p376: thpad.connectstyle=Relief thpad.reliefconductorwidth=19.68 thpad.reliefentries=4 thpad.polygonreliefangle="90 Angle" thpad.airgapwidth=9.84 smdpad.connectstyle=Relief smdpad.reliefconductorwidth=19.68 smdpad.reliefentries=4 smdpad.polygonreliefangle="90 Angle" smdpad.airgapwidth=9.84 via.connectstyle=Direct via.reliefconductorwidth=5.12 via.reliefentries=2 via.polygonreliefangle="90 Angle" via.airgapwidth=0
PolygonConnect PolygonConnect_In_-U_VENT_L01_P528 [IsNamedPolygon('-U_VENT_L01_P528')] p377: thpad.connectstyle=Relief thpad.reliefconductorwidth=19.68 thpad.reliefentries=4 thpad.polygonreliefangle="90 Angle" thpad.airgapwidth=9.84 smdpad.connectstyle=Relief smdpad.reliefconductorwidth=19.68 smdpad.reliefentries=4 smdpad.polygonreliefangle="90 Angle" smdpad.airgapwidth=9.84 via.connectstyle=Direct via.reliefconductorwidth=5.12 via.reliefentries=2 via.polygonreliefangle="90 Angle" via.airgapwidth=0
PolygonConnect PolygonConnect_In_GND_L01_P438 [IsNamedPolygon('GND_L01_P438')] p378: thpad.connectstyle=Relief thpad.reliefconductorwidth=19.68 thpad.reliefentries=4 thpad.polygonreliefangle="90 Angle" thpad.airgapwidth=9.84 smdpad.connectstyle=Relief smdpad.reliefconductorwidth=19.68 smdpad.reliefentries=4 smdpad.polygonreliefangle="90 Angle" smdpad.airgapwidth=9.84 via.connectstyle=Direct via.reliefconductorwidth=5.12 via.reliefentries=2 via.polygonreliefangle="90 Angle" via.airgapwidth=0
PolygonConnect PolygonConnect_In_U_MOST_L-01_P340 [IsNamedPolygon('U_MOST_L-01_P340')] p379: thpad.connectstyle=Relief thpad.reliefconductorwidth=19.68 thpad.reliefentries=4 thpad.polygonreliefangle="90 Angle" thpad.airgapwidth=9.84 smdpad.connectstyle=Relief smdpad.reliefconductorwidth=19.68 smdpad.reliefentries=4 smdpad.polygonreliefangle="90 Angle" smdpad.airgapwidth=9.84 via.connectstyle=Direct via.reliefconductorwidth=5.12 via.reliefentries=2 via.polygonreliefangle="90 Angle" via.airgapwidth=0
PolygonConnect PolygonConnect_In_UH_L-01_P319 [IsNamedPolygon('UH_L-01_P319')] p380: thpad.connectstyle=Relief thpad.reliefconductorwidth=19.68 thpad.reliefentries=4 thpad.polygonreliefangle="90 Angle" thpad.airgapwidth=9.84 smdpad.connectstyle=Relief smdpad.reliefconductorwidth=19.68 smdpad.reliefentries=4 smdpad.polygonreliefangle="90 Angle" smdpad.airgapwidth=9.84 via.connectstyle=Direct via.reliefconductorwidth=5.12 via.reliefentries=2 via.polygonreliefangle="90 Angle" via.airgapwidth=0
PolygonConnect PolygonConnect_In_PGND_L01_P281 [IsNamedPolygon('PGND_L01_P281')] p381: thpad.connectstyle=Relief thpad.reliefconductorwidth=19.68 thpad.reliefentries=4 thpad.polygonreliefangle="90 Angle" thpad.airgapwidth=9.84 smdpad.connectstyle=Relief smdpad.reliefconductorwidth=19.68 smdpad.reliefentries=4 smdpad.polygonreliefangle="90 Angle" smdpad.airgapwidth=9.84 via.connectstyle=Direct via.reliefconductorwidth=5.12 via.reliefentries=2 via.polygonreliefangle="90 Angle" via.airgapwidth=0
PolygonConnect PolygonConnect_In_+U_POWER_L01_P122 [IsNamedPolygon('+U_POWER_L01_P122')] p382: thpad.connectstyle=Relief thpad.reliefconductorwidth=19.68 thpad.reliefentries=4 thpad.polygonreliefangle="90 Angle" thpad.airgapwidth=9.84 smdpad.connectstyle=Relief smdpad.reliefconductorwidth=19.68 smdpad.reliefentries=4 smdpad.polygonreliefangle="90 Angle" smdpad.airgapwidth=9.84 via.connectstyle=Direct via.reliefconductorwidth=5.12 via.reliefentries=2 via.polygonreliefangle="90 Angle" via.airgapwidth=0
PolygonConnect PolygonConnect_In_$6N737_L02_P020 [IsNamedPolygon('$6N737_L02_P020')] p383: thpad.connectstyle=Relief thpad.reliefconductorwidth=19.68 thpad.reliefentries=4 thpad.polygonreliefangle="90 Angle" thpad.airgapwidth=9.84 smdpad.connectstyle=Relief smdpad.reliefconductorwidth=19.68 smdpad.reliefentries=4 smdpad.polygonreliefangle="90 Angle" smdpad.airgapwidth=9.84 via.connectstyle=Direct via.reliefconductorwidth=5.12 via.reliefentries=2 via.polygonreliefangle="90 Angle" via.airgapwidth=0
PolygonConnect PolygonConnect_In_-U_VENT_L-01_P527 [IsNamedPolygon('-U_VENT_L-01_P527')] p384: thpad.connectstyle=Relief thpad.reliefconductorwidth=19.68 thpad.reliefentries=4 thpad.polygonreliefangle="90 Angle" thpad.airgapwidth=9.84 smdpad.connectstyle=Relief smdpad.reliefconductorwidth=19.68 smdpad.reliefentries=4 smdpad.polygonreliefangle="90 Angle" smdpad.airgapwidth=9.84 via.connectstyle=Direct via.reliefconductorwidth=5.12 via.reliefentries=2 via.polygonreliefangle="90 Angle" via.airgapwidth=0
PolygonConnect PolygonConnect_In_UL_L-01_P361 [IsNamedPolygon('UL_L-01_P361')] p385: thpad.connectstyle=Relief thpad.reliefconductorwidth=19.68 thpad.reliefentries=4 thpad.polygonreliefangle="90 Angle" thpad.airgapwidth=9.84 smdpad.connectstyle=Relief smdpad.reliefconductorwidth=19.68 smdpad.reliefentries=4 smdpad.polygonreliefangle="90 Angle" smdpad.airgapwidth=9.84 via.connectstyle=Direct via.reliefconductorwidth=5.12 via.reliefentries=2 via.polygonreliefangle="90 Angle" via.airgapwidth=0
PolygonConnect PolygonConnect_In_$4N4003_L02_P652 [IsNamedPolygon('$4N4003_L02_P652')] p386: thpad.connectstyle=Relief thpad.reliefconductorwidth=19.68 thpad.reliefentries=4 thpad.polygonreliefangle="90 Angle" thpad.airgapwidth=9.84 smdpad.connectstyle=Relief smdpad.reliefconductorwidth=19.68 smdpad.reliefentries=4 smdpad.polygonreliefangle="90 Angle" smdpad.airgapwidth=9.84 via.connectstyle=Direct via.reliefconductorwidth=5.12 via.reliefentries=2 via.polygonreliefangle="90 Angle" via.airgapwidth=0
PolygonConnect PolygonConnect_In_UL_L01_P378 [IsNamedPolygon('UL_L01_P378')] p387: thpad.connectstyle=Relief thpad.reliefconductorwidth=19.68 thpad.reliefentries=4 thpad.polygonreliefangle="90 Angle" thpad.airgapwidth=9.84 smdpad.connectstyle=Relief smdpad.reliefconductorwidth=19.68 smdpad.reliefentries=4 smdpad.polygonreliefangle="90 Angle" smdpad.airgapwidth=9.84 via.connectstyle=Direct via.reliefconductorwidth=5.12 via.reliefentries=2 via.polygonreliefangle="90 Angle" via.airgapwidth=0